# Altium PCB ODOS_PDB_5V_pcb.PcbDoc
Units mm, origin at the board's own origin, x right, y up, seen from the top; angles counter-clockwise.
Board outline 65 x 30 mm, 2 copper layers (Top Layer, Bottom Layer); 12 components, 2 nets, 21 pads, 4 vias.
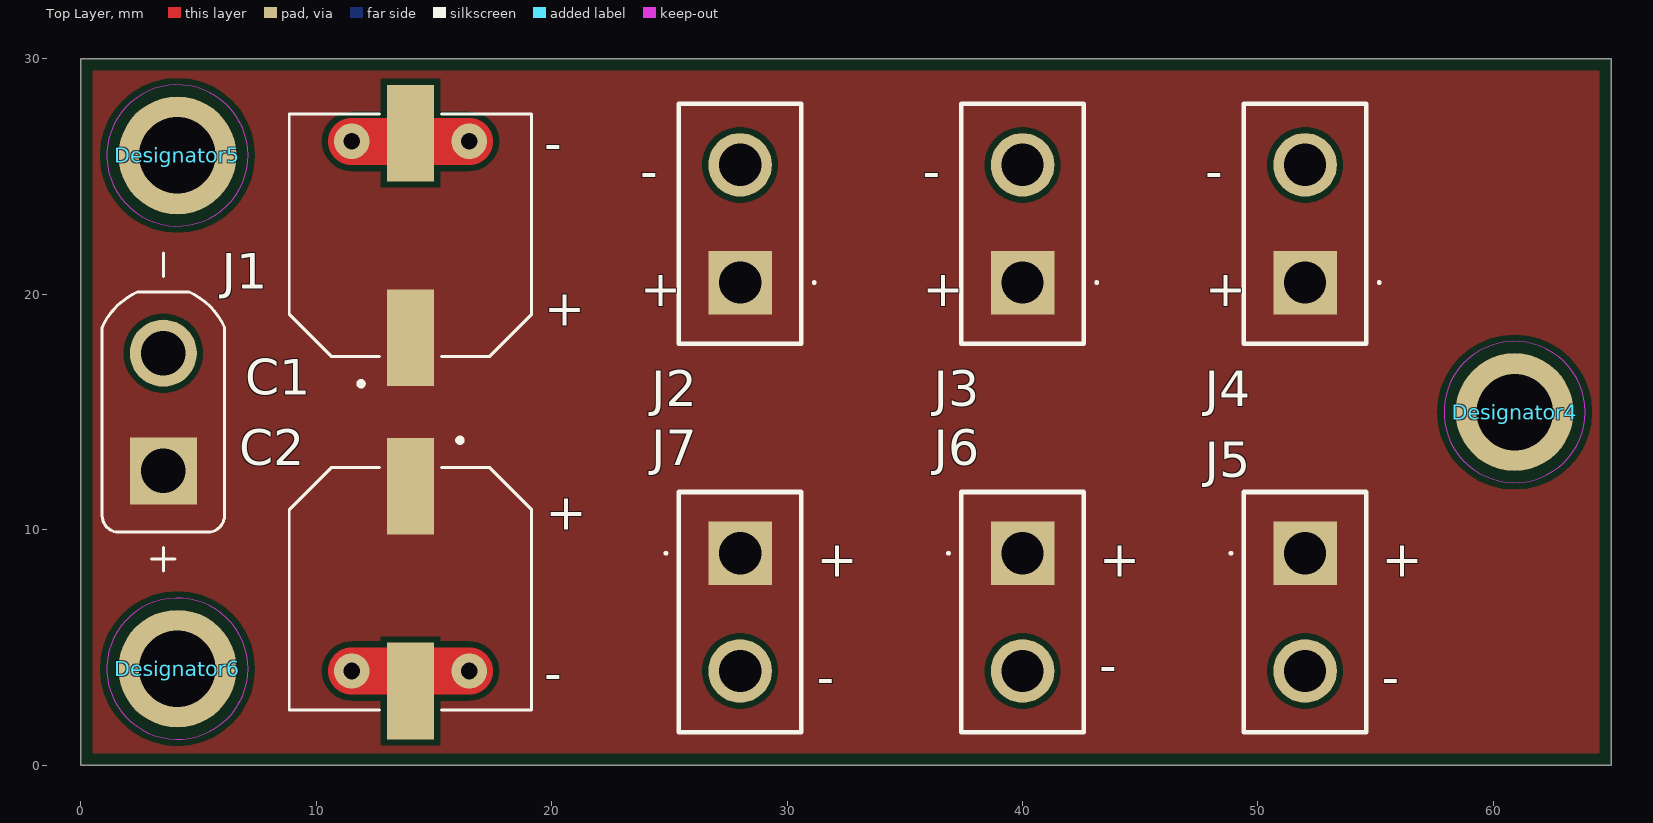
[diagram p0: Top Layer view]
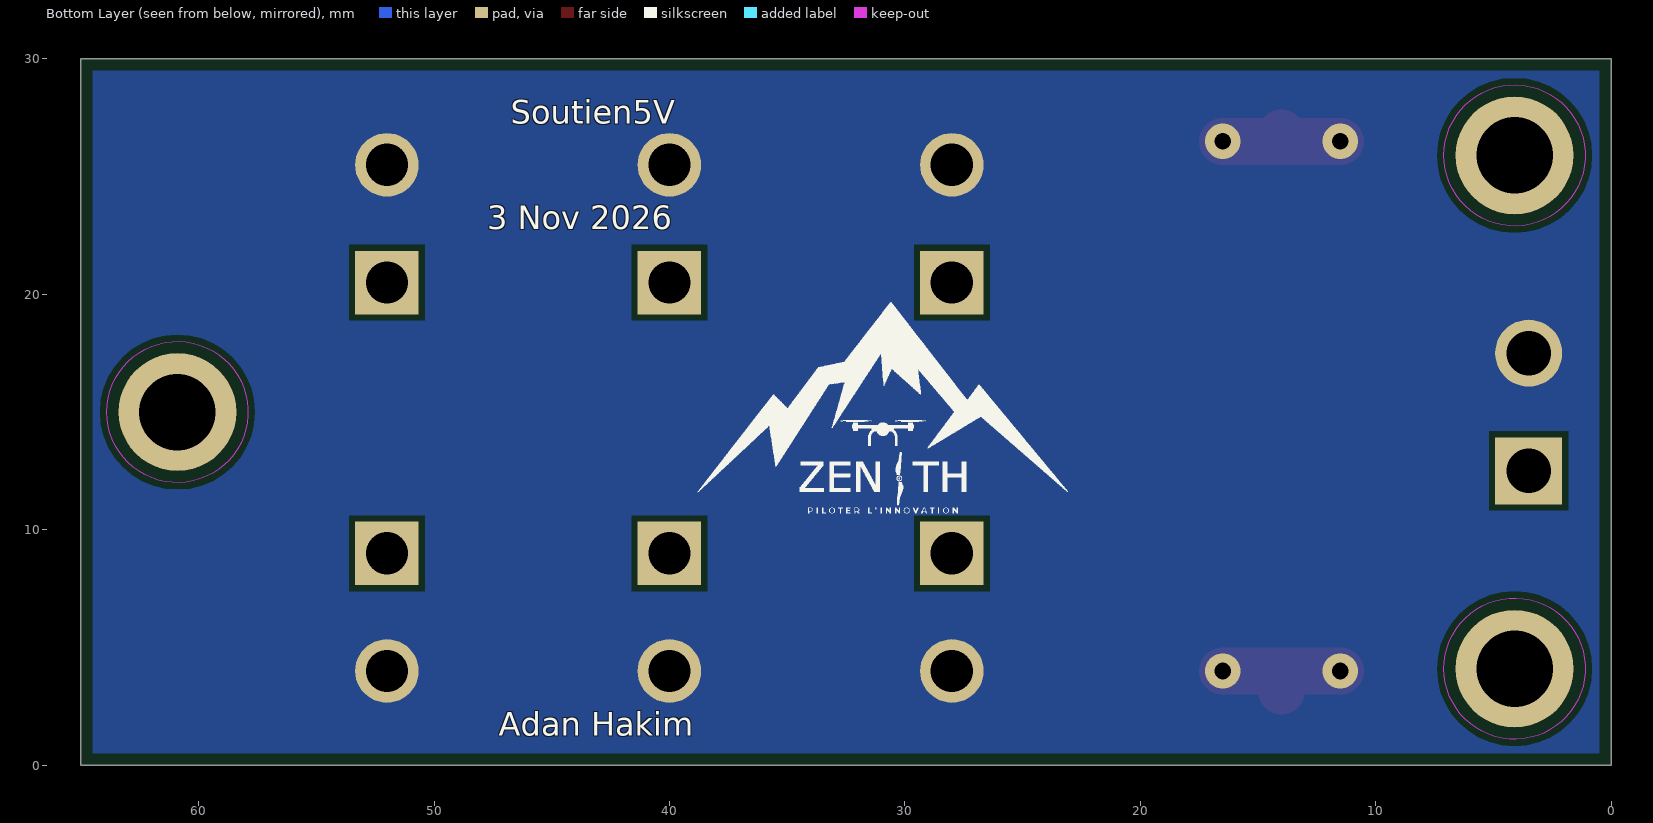
[diagram p1: Bottom Layer view, seen from below]
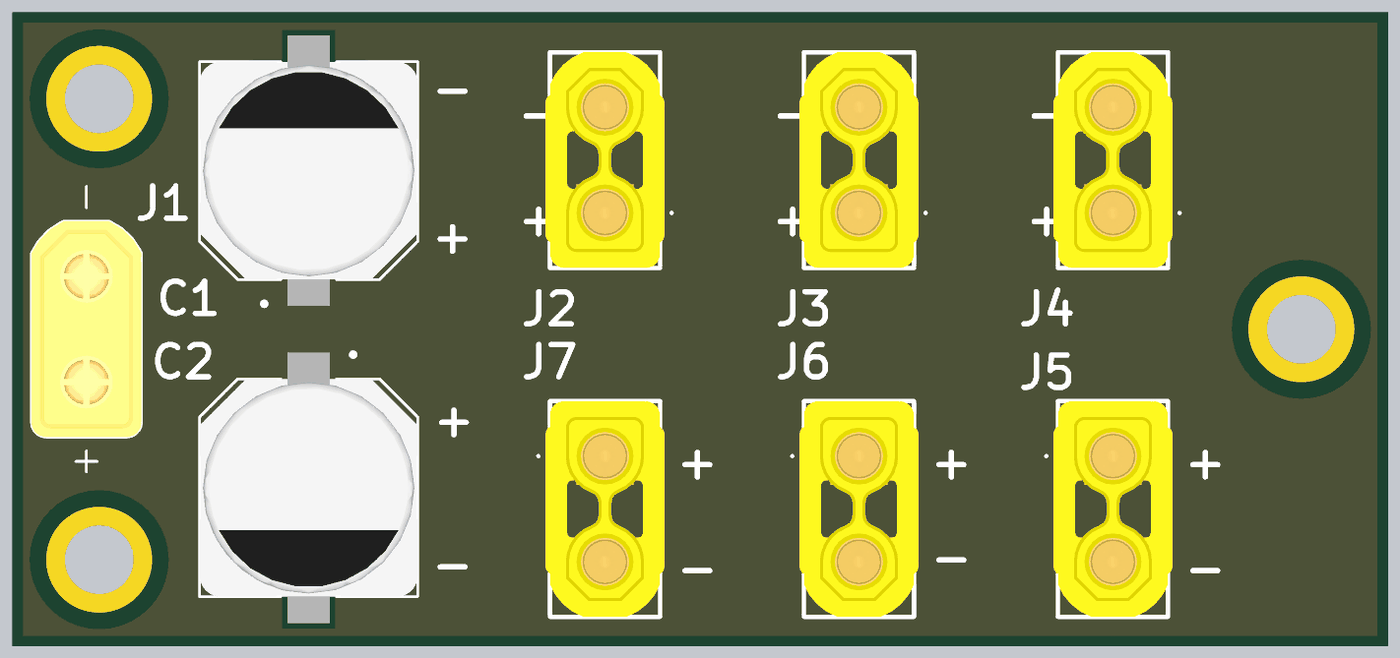
[diagram p2: 3D render of the assembled board from above, using the file's embedded part models]

## Layer stack, top to bottom
Top Solder: solder mask 0.0102, Solder Resist, Dk 3.5
Top Layer: signal copper 0.0356
Dielectric 1: dielectric 0.32, FR-4, Dk 4.8
Bottom Layer: signal copper 0.0356
Bottom Solder: solder mask 0.0102, Solder Resist, Dk 3.5

## Board outline
0,0 0,30 65,30 65,0

## Design rules (kind name [scope] priority, off if disabled: settings)
Clearance [All] p1: gap=0.254 ignorepadtopadclearanceinfootprint=FALSE
HoleSize [All] p1: absolutevalues=TRUE maxlimit=3.3 minlimit=0.025 maxpercent=80.000 minpercent=20.000
PolygonConnect [All] p1: connectstyle=Direct reliefconductorwidth=0.254 reliefentries=4 polygonreliefangle="90 Angle" airgapwidth=0.254
RoutingVias [All] p1: holewidth=0.711 width=1.27 viastyle="Through Hole" minholewidth=0.711 minwidth=1.27 maxholewidth=0.711 maxwidth=1.27
SolderMaskExpansion [All] p1: expansion=0 istentingtop=FALSE
SupplyNets "Schematic Supply Nets_1" [InNet('+5')] p1: voltage=0.000
SupplyNets "Schematic Supply Nets" [InNet('GND')] p2: voltage=0.000
Width [All] p1: maxlimit=3 minlimit=0.15 preferedwidth=1 minimp=50.000000 maximp=50.000000 favimp=50.000000
29 further rules are at their usual default settings.

## Components (designator, comment, footprint, x,y, rotation, side; value= is the part's Value field where it differs from the comment)
C1 "1000uF 10V" CAP_EEEFP1A102AP 14,22.5 r90 top
C2 "EEEFP1A102AP" CAP_EEEFP1A102AP 14,7.5 r270 top
Designator4 "Comment" "MH - Footprint" 60.9,15 r0 top
Designator5 "Comment" "MH - Footprint" 4.1,25.9 r0 top
Designator6 "Comment" "MH - Footprint" 4.1,4.1 r0 top
J1 "XT30UPB-M" AMASS_XT30UPB-M 3.5,15 r90 top
J2 "XT30UPB-F" XT30UPBF 28,20.5 r0 top
J3 "XT30UPB-F" XT30UPBF 40,20.5 r0 top
J4 "XT30UPB-F" XT30UPBF 52,20.5 r0 top
J5 "XT30UPB-F" XT30UPBF 52,9 r180 top
J6 "XT30UPB-F" XT30UPBF 40,9 r180 top
J7 "XT30UPB-F" XT30UPBF 28,9 r180 top

## Footprints (in the part's own frame and the unit in brackets; to place one, negate y for a bottom-side part, rotate by r counter-clockwise, add the part's x,y. Pads: shape width x height; smd on the part's side, far side on the other; paste and mask are expansions set on the pad)
AMASS_XT30UPB-M [mm]
  round 2.85 hole 1.9 mask+0.102: N(2.5,0)
  rect 2.85x2.85 / inner round 2.85 / far side rect 2.85x2.85 hole 1.9 mask+0.102: P(-2.5,0)
  silkscreen extent -6.75,-2.61 6.75,2.61, body extent -5.1,-2.6 5.1,2.6, height 10.7
CAP_EEEFP1A102AP [mm]
  rect 4.1x2 smd: 1(-4.35,0) 2(4.35,0)
  silkscreen extent -6.4,-5.15 5.15,5.15, body extent -5.85,-5.15 5.85,5.15, height 9.3
"MH - Footprint" [mm]
  round 5 hole 3.25: MH(0,0)
  Keep-Out Layer circle w0.05: c0,0 r3
XT30UPBF [mm]
  rect 2.7x2.7 hole 1.8: 1(0,0)
  round 2.7 hole 1.8: 2(0,5)
  silkscreen extent -2.6,-2.6 3.2,7.6, body extent -2.81,-2.6 2.81,7.6, height 9.41

## Part data
C1: library part EEEFP1A102AP, "Cap Aluminum 1000uF 10V 20% (10 X 10.2mm) SMD 0.06 Ohm 1190mA 2000 hr 105Â°C Embossed T/R", Package="RADIAL-2 Panasonic", Check_prices=https://www.snapeda.com/parts/EEEFP1A102AP/Panasonic/view-part/?ref=eda, Digi-Key_Part_Number=PCE4434CT-ND, MF=Panasonic, MP=EEEFP1A102AP, Purchase-URL=https://pricing.snapeda.com/search/part/EEEFP1A102AP/?ref=eda, SnapEDA_Link=https://www.snapeda.com/parts/EEEFP1A102AP/Panasonic/view-part/?ref=snap
C2: "Cap Aluminum 1000uF 10V 20% (10 X 10.2mm) SMD 0.06 Ohm 1190mA 2000 hr 105Â°C Embossed T/R", Package="RADIAL-2 Panasonic", Check_prices=https://www.snapeda.com/parts/EEEFP1A102AP/Panasonic/view-part/?ref=eda, Digi-Key_Part_Number=PCE4434CT-ND, MF=Panasonic, MP=EEEFP1A102AP, Purchase-URL=https://pricing.snapeda.com/search/part/EEEFP1A102AP/?ref=eda, SnapEDA_Link=https://www.snapeda.com/parts/EEEFP1A102AP/Panasonic/view-part/?ref=snap
J1 J2 J3 J4 J5 J6 J7: "Connector", Manufacturer_Name=Amass
  J1: Datasheet Link=https://www.tme.eu/Document/4acc913878197f8c2e30d4b8cdc47230/XT30UPB%20SPEC.pdf, Height=10.7mm, Manufacturer_Part_Number=XT30UPB-M
  J2 J3 J4 J5 J6 J7: Datasheet Link=https://www.tme.eu/Document/81f11ca924696756331f21b972812074/XT30PB-F.pdf, Height=9.4mm, Manufacturer_Part_Number=XT30UPB-F

## Via types
v1: diameter 1.5, hole 0.711, Top Layer to Bottom Layer, 4 vias

## Nets (pads, with @x,y where several pads share a name; then routed paths per layer and width w, separated by ;. In a path a pad name is that pad's centre, name@x,y a point inside that pad or via, vN(x,y) a via of type N, cw(c..) or ccw(c..) an arc to the next point about the centre after c; other vN are vias at no path point)
+5: C1.1 C2.1 J1.P J2.1 J3.1 J4.1 J5.1 J6.1 J7.1
GND: C1.2 C2.2 J1.N J2.2 J3.2 J4.2 J5.2 J6.2 J7.2 | length 11.2
  Top Layer w2: v1(11.5,4) C2.2@14,4 ; v1(11.5,26.5) C1.2@14,26.5 ; C2.2 C2.2@14,4 ; C1.2 C1.2@14,26.5 ; v1(16.5,4) C2.2@14,4 ; v1(16.5,26.5) C1.2@14,26.5
pads on no net: Designator4.MH Designator5.MH Designator6.MH

## Polygon pours and split planes (outlines as drawn)
GND on Bottom Layer "GND_L02_P000" (solid, pour order 0): 0.5,0.5 0.5,29.5 64.5,29.5 64.5,0.5
+5 on Top Layer "+5_L01_P001" (solid, pour order 1): 0.5,29.5 64.5,29.5 64.5,0.5 0.5,0.5

## Silkscreen, mask and mechanical layers (free items; w line width, h text height)
Top Overlay:
  text "-" at 19.686,25.667 h1.52
  text "-" at 23.754,24.492 h1.52
  text "-" at 35.754,24.492 h1.52
  text "-" at 47.754,24.492 h1.52
  text "+" at 23.754,19.5 h1.52
  text "+" at 35.754,19.5 h1.52
  text "+" at 47.754,19.5 h1.52
  text "+" at 19.686,18.675 h1.52
  text "+" at 19.754,10 h1.52
  text "+" at 31.254,8 h1.52
  text "+" at 43.254,8 h1.52
  text "+" at 55.254,8 h1.52
  text "-" at 43.254,3.492 h1.52
  text "-" at 19.686,3.167 h1.52
  text "-" at 31.254,2.992 h1.52
  text "-" at 55.254,2.992 h1.52
Bottom Overlay:
  drawing of 35 lines, arcs and shapes, not listed
  text "Soutien5V" at 46.746,27.254 h1
  text "3 Nov 2026" at 47.746,22.754 h1
  text "Adan Hakim" at 47.246,1.254 h1